# Altium PCB BOARD_2LAYER.PcbDoc (part 1 of 7)
Units mil, origin at the board's own origin, x right, y up, seen from the top; angles counter-clockwise.
Board outline 7677.17 x 7677.17 mil, 2 copper layers (Top Layer, Bottom Layer), stack 34.252 mil thick; 625 components, 375 nets, 1924 pads, 450 vias.
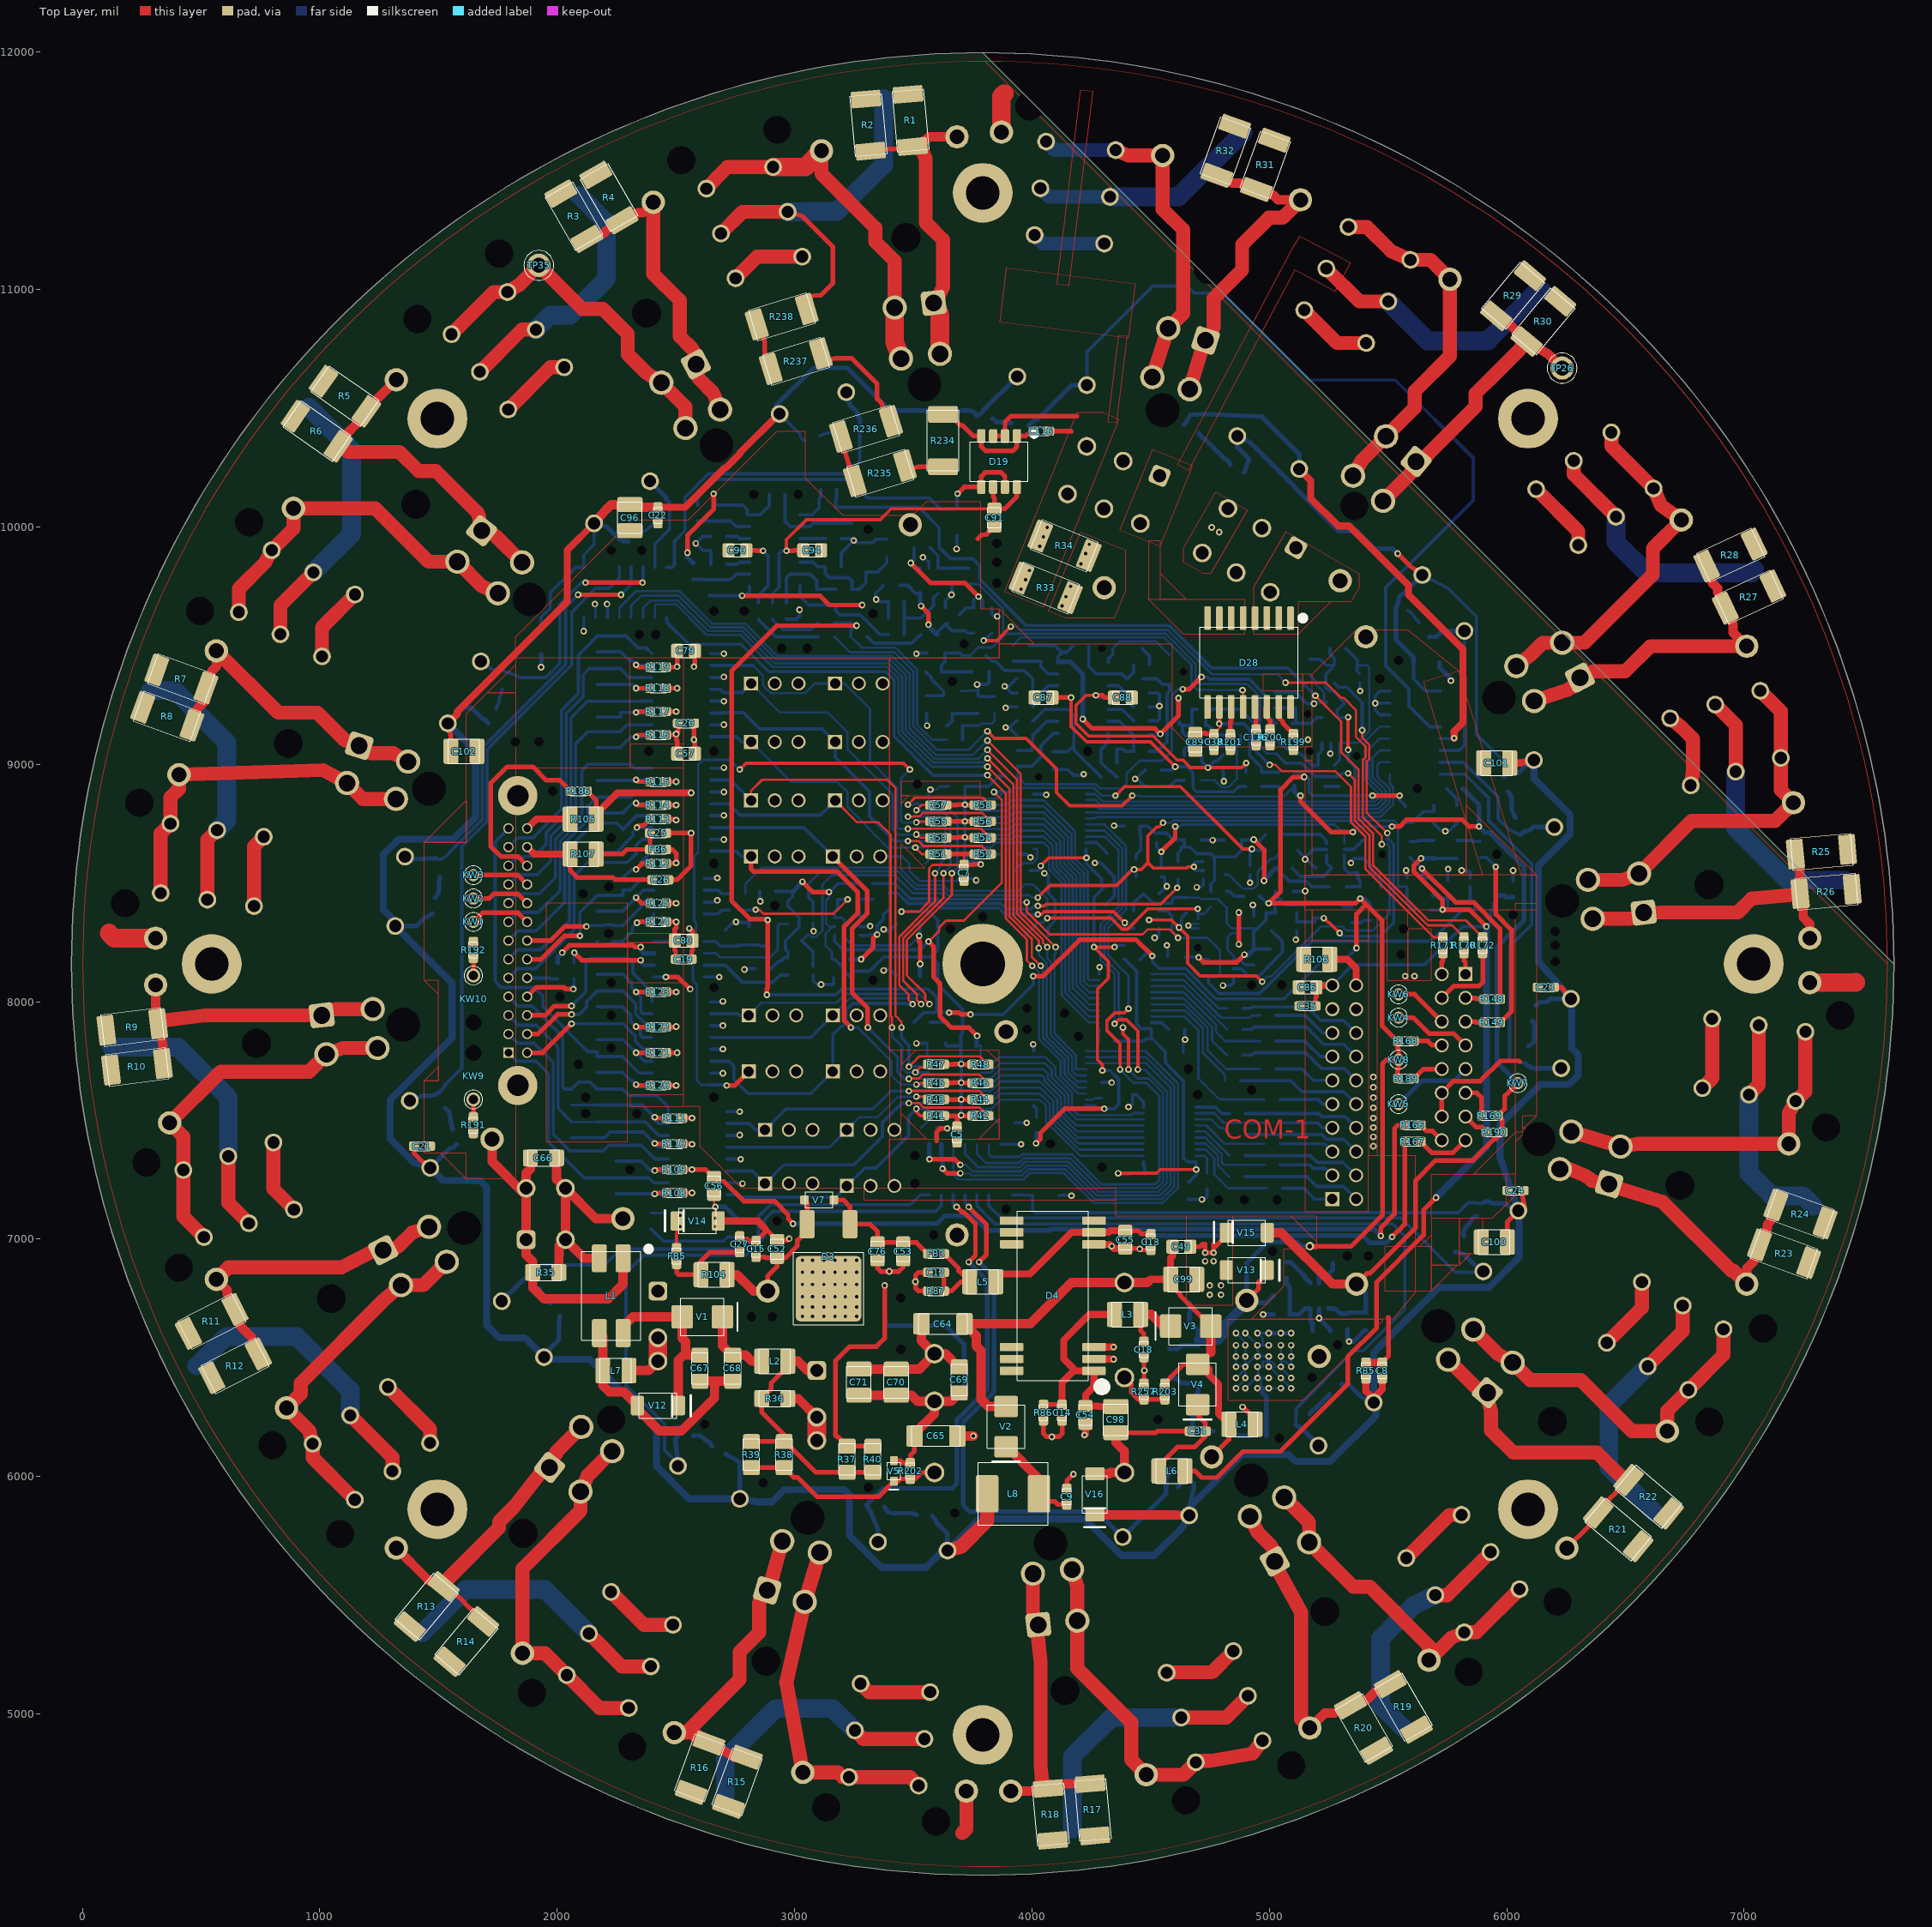
[diagram p0: Top Layer view]
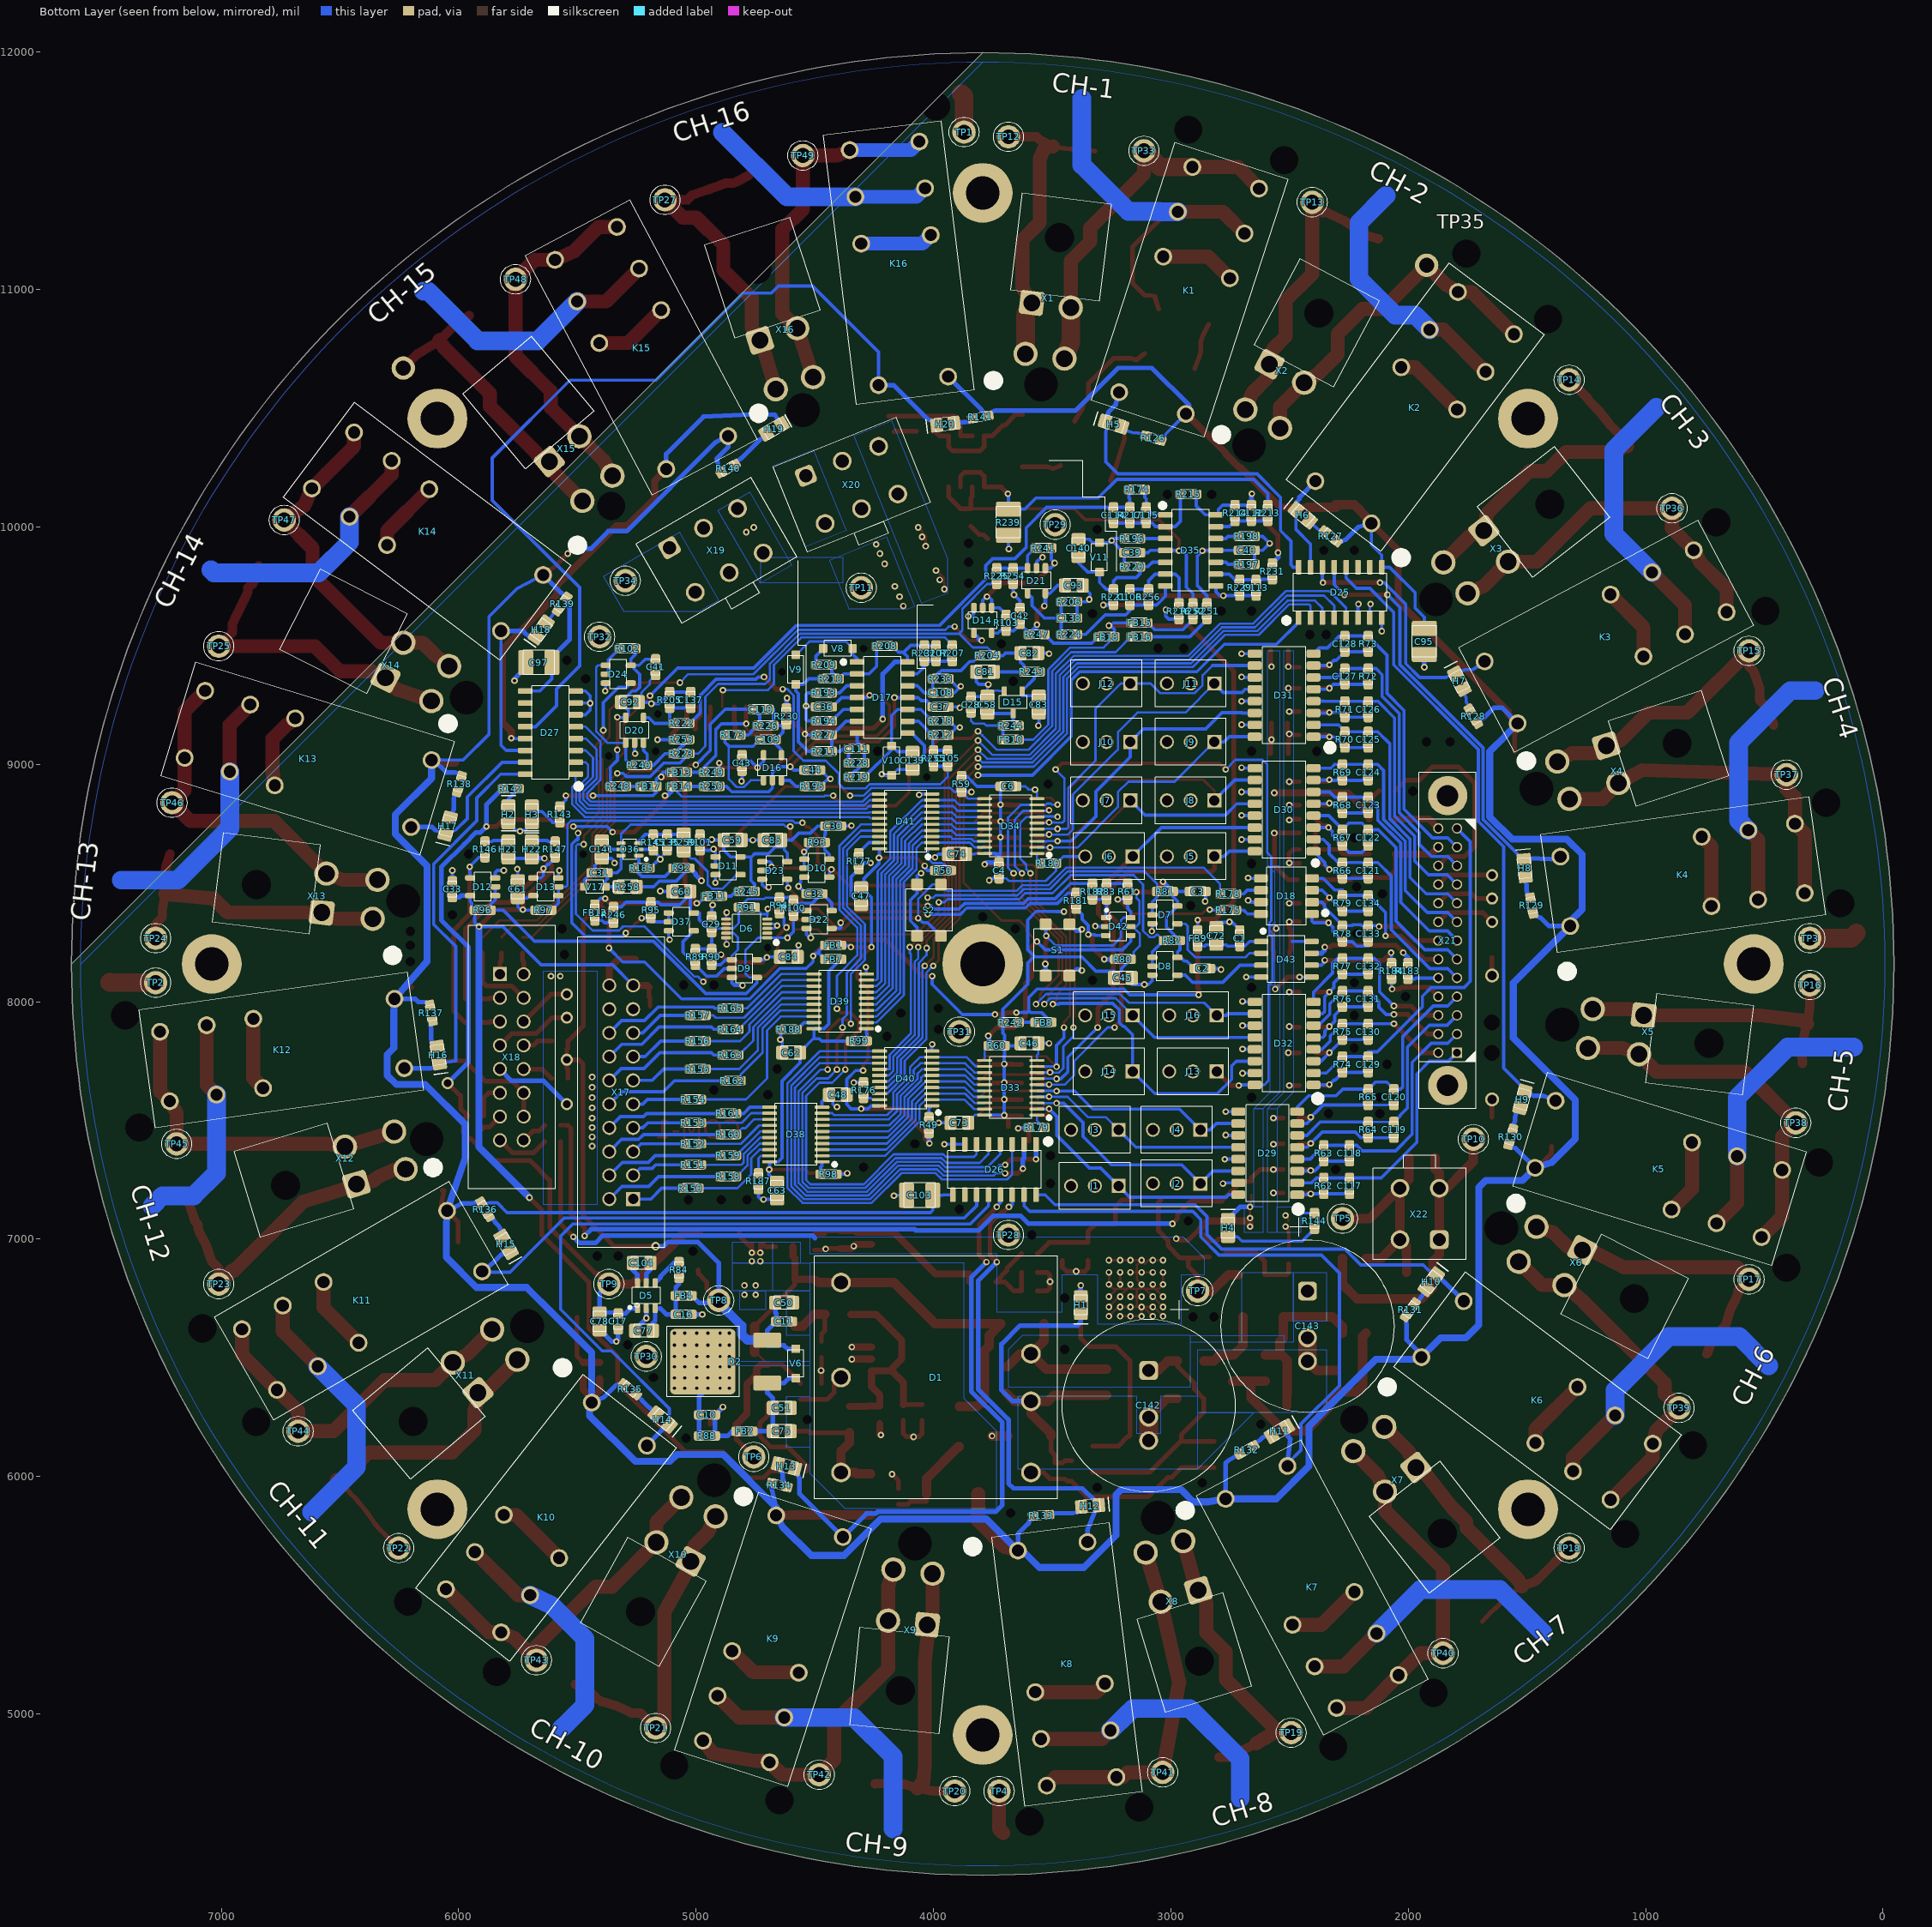
[diagram p1: Bottom Layer view, seen from below]

## Layer stack, top to bottom
Top Solder: solder mask 3, Solder_Mask, Dk 1
Top Layer: signal copper 1.5748
Dielectric 3: prepreg 31.1024, Core/Pre-preg, Dk 4.7
Bottom Layer: signal copper 1.5748
Bottom Solder: solder mask 3, Solder_Mask, Dk 1

## Board outline
7631.05,8159.45 ccw(c3792.46,8159.45) 3792.46,11998.03 ccw(c3792.46,8159.45) -46.12,8159.45 ccw(c3792.46,8159.45) 3792.46,4320.87 ccw(c3792.46,8159.45) 7631.05,8159.45 ccw(c3792.46,8159.45)

## Design rules (kind name [scope] priority, off if disabled: settings)
Clearance [All] p1: gap=10 ignorepadtopadclearanceinfootprint=FALSE
PolygonConnect PolygonConnect_In_OUT_L01_P006 [IsNamedPolygon('OUT_L01_P006')] p1: thpad.connectstyle=Relief thpad.reliefconductorwidth=19.68 thpad.reliefentries=4 thpad.polygonreliefangle="90 Angle" thpad.airgapwidth=19.68 smdpad.connectstyle=Relief smdpad.reliefconductorwidth=9.84 smdpad.reliefentries=4 smdpad.polygonreliefangle="90 Angle" smdpad.airgapwidth=9.84 via.connectstyle=Direct via.reliefconductorwidth=5.12 via.reliefentries=2 via.polygonreliefangle="90 Angle" via.airgapwidth=0
PolygonConnect PolygonConnect_In_GND_L01_P049 [IsNamedPolygon('GND_L01_P049')] p2: thpad.connectstyle=Relief thpad.reliefconductorwidth=19.68 thpad.reliefentries=4 thpad.polygonreliefangle="90 Angle" thpad.airgapwidth=19.68 smdpad.connectstyle=Relief smdpad.reliefconductorwidth=9.84 smdpad.reliefentries=4 smdpad.polygonreliefangle="90 Angle" smdpad.airgapwidth=9.84 via.connectstyle=Direct via.reliefconductorwidth=5.12 via.reliefentries=2 via.polygonreliefangle="90 Angle" via.airgapwidth=0
PolygonConnect PolygonConnect_In_GND_L01_P058 [IsNamedPolygon('GND_L01_P058')] p3: thpad.connectstyle=Relief thpad.reliefconductorwidth=19.68 thpad.reliefentries=4 thpad.polygonreliefangle="90 Angle" thpad.airgapwidth=19.68 smdpad.connectstyle=Relief smdpad.reliefconductorwidth=9.84 smdpad.reliefentries=4 smdpad.polygonreliefangle="90 Angle" smdpad.airgapwidth=9.84 via.connectstyle=Direct via.reliefconductorwidth=5.12 via.reliefentries=2 via.polygonreliefangle="90 Angle" via.airgapwidth=0
PolygonConnect PolygonConnect_In_GND_L01_P024 [IsNamedPolygon('GND_L01_P024')] p4: thpad.connectstyle=Relief thpad.reliefconductorwidth=19.68 thpad.reliefentries=4 thpad.polygonreliefangle="90 Angle" thpad.airgapwidth=19.68 smdpad.connectstyle=Relief smdpad.reliefconductorwidth=9.84 smdpad.reliefentries=4 smdpad.polygonreliefangle="90 Angle" smdpad.airgapwidth=9.84 via.connectstyle=Direct via.reliefconductorwidth=5.12 via.reliefentries=2 via.polygonreliefangle="90 Angle" via.airgapwidth=0
PolygonConnect PolygonConnect_In_GND_L01_P043 [IsNamedPolygon('GND_L01_P043')] p5: thpad.connectstyle=Relief thpad.reliefconductorwidth=19.68 thpad.reliefentries=4 thpad.polygonreliefangle="90 Angle" thpad.airgapwidth=19.68 smdpad.connectstyle=Relief smdpad.reliefconductorwidth=9.84 smdpad.reliefentries=4 smdpad.polygonreliefangle="90 Angle" smdpad.airgapwidth=9.84 via.connectstyle=Direct via.reliefconductorwidth=5.12 via.reliefentries=2 via.polygonreliefangle="90 Angle" via.airgapwidth=0
PolygonConnect PolygonConnect_In_GND_L02_P051 [IsNamedPolygon('GND_L02_P051')] p6: thpad.connectstyle=Relief thpad.reliefconductorwidth=19.68 thpad.reliefentries=4 thpad.polygonreliefangle="90 Angle" thpad.airgapwidth=19.68 smdpad.connectstyle=Relief smdpad.reliefconductorwidth=9.84 smdpad.reliefentries=4 smdpad.polygonreliefangle="90 Angle" smdpad.airgapwidth=9.84 via.connectstyle=Direct via.reliefconductorwidth=5.12 via.reliefentries=2 via.polygonreliefangle="90 Angle" via.airgapwidth=0
PolygonConnect PolygonConnect_In_IN_COM_L01_P015 [IsNamedPolygon('IN_COM_L01_P015')] p7: thpad.connectstyle=Relief thpad.reliefconductorwidth=19.68 thpad.reliefentries=4 thpad.polygonreliefangle="90 Angle" thpad.airgapwidth=19.68 smdpad.connectstyle=Relief smdpad.reliefconductorwidth=9.84 smdpad.reliefentries=4 smdpad.polygonreliefangle="90 Angle" smdpad.airgapwidth=9.84 via.connectstyle=Direct via.reliefconductorwidth=5.12 via.reliefentries=2 via.polygonreliefangle="90 Angle" via.airgapwidth=0
PolygonConnect PolygonConnect_In_~OUT_L01_P005 [IsNamedPolygon('~OUT_L01_P005')] p8: thpad.connectstyle=Relief thpad.reliefconductorwidth=19.68 thpad.reliefentries=4 thpad.polygonreliefangle="90 Angle" thpad.airgapwidth=19.68 smdpad.connectstyle=Relief smdpad.reliefconductorwidth=9.84 smdpad.reliefentries=4 smdpad.polygonreliefangle="90 Angle" smdpad.airgapwidth=9.84 via.connectstyle=Direct via.reliefconductorwidth=5.12 via.reliefentries=2 via.polygonreliefangle="90 Angle" via.airgapwidth=0
PolygonConnect PolygonConnect_In_~OUT_L01_P004 [IsNamedPolygon('~OUT_L01_P004')] p9: thpad.connectstyle=Relief thpad.reliefconductorwidth=19.68 thpad.reliefentries=4 thpad.polygonreliefangle="90 Angle" thpad.airgapwidth=19.68 smdpad.connectstyle=Relief smdpad.reliefconductorwidth=9.84 smdpad.reliefentries=4 smdpad.polygonreliefangle="90 Angle" smdpad.airgapwidth=9.84 via.connectstyle=Direct via.reliefconductorwidth=5.12 via.reliefentries=2 via.polygonreliefangle="90 Angle" via.airgapwidth=0
PolygonConnect PolygonConnect_In_~IN_COM_L02_P018 [IsNamedPolygon('~IN_COM_L02_P018')] p10: thpad.connectstyle=Relief thpad.reliefconductorwidth=19.68 thpad.reliefentries=4 thpad.polygonreliefangle="90 Angle" thpad.airgapwidth=19.68 smdpad.connectstyle=Relief smdpad.reliefconductorwidth=9.84 smdpad.reliefentries=4 smdpad.polygonreliefangle="90 Angle" smdpad.airgapwidth=9.84 via.connectstyle=Direct via.reliefconductorwidth=5.12 via.reliefentries=2 via.polygonreliefangle="90 Angle" via.airgapwidth=0
PolygonConnect PolygonConnect_In_GND_L01_P082 [IsNamedPolygon('GND_L01_P082')] p11: thpad.connectstyle=Relief thpad.reliefconductorwidth=19.68 thpad.reliefentries=4 thpad.polygonreliefangle="90 Angle" thpad.airgapwidth=19.68 smdpad.connectstyle=Relief smdpad.reliefconductorwidth=9.84 smdpad.reliefentries=4 smdpad.polygonreliefangle="90 Angle" smdpad.airgapwidth=9.84 via.connectstyle=Direct via.reliefconductorwidth=5.12 via.reliefentries=2 via.polygonreliefangle="90 Angle" via.airgapwidth=0
PolygonConnect PolygonConnect_In_GND_L01_P076 [IsNamedPolygon('GND_L01_P076')] p12: thpad.connectstyle=Relief thpad.reliefconductorwidth=19.68 thpad.reliefentries=4 thpad.polygonreliefangle="90 Angle" thpad.airgapwidth=19.68 smdpad.connectstyle=Relief smdpad.reliefconductorwidth=9.84 smdpad.reliefentries=4 smdpad.polygonreliefangle="90 Angle" smdpad.airgapwidth=9.84 via.connectstyle=Direct via.reliefconductorwidth=5.12 via.reliefentries=2 via.polygonreliefangle="90 Angle" via.airgapwidth=0
PolygonConnect PolygonConnect_In_GND_L01_P045 [IsNamedPolygon('GND_L01_P045')] p13: thpad.connectstyle=Relief thpad.reliefconductorwidth=19.68 thpad.reliefentries=4 thpad.polygonreliefangle="90 Angle" thpad.airgapwidth=19.68 smdpad.connectstyle=Relief smdpad.reliefconductorwidth=9.84 smdpad.reliefentries=4 smdpad.polygonreliefangle="90 Angle" smdpad.airgapwidth=9.84 via.connectstyle=Direct via.reliefconductorwidth=5.12 via.reliefentries=2 via.polygonreliefangle="90 Angle" via.airgapwidth=0
PolygonConnect PolygonConnect_In_-U_COM_L02_P103 [IsNamedPolygon('-U_COM_L02_P103')] p14: thpad.connectstyle=Relief thpad.reliefconductorwidth=19.68 thpad.reliefentries=4 thpad.polygonreliefangle="90 Angle" thpad.airgapwidth=19.68 smdpad.connectstyle=Relief smdpad.reliefconductorwidth=9.84 smdpad.reliefentries=4 smdpad.polygonreliefangle="90 Angle" smdpad.airgapwidth=9.84 via.connectstyle=Direct via.reliefconductorwidth=5.12 via.reliefentries=2 via.polygonreliefangle="90 Angle" via.airgapwidth=0
PolygonConnect PolygonConnect_In_$3N7062_L02_P089 [IsNamedPolygon('$3N7062_L02_P089')] p15: thpad.connectstyle=Relief thpad.reliefconductorwidth=19.68 thpad.reliefentries=4 thpad.polygonreliefangle="90 Angle" thpad.airgapwidth=19.68 smdpad.connectstyle=Relief smdpad.reliefconductorwidth=9.84 smdpad.reliefentries=4 smdpad.polygonreliefangle="90 Angle" smdpad.airgapwidth=9.84 via.connectstyle=Direct via.reliefconductorwidth=5.12 via.reliefentries=2 via.polygonreliefangle="90 Angle" via.airgapwidth=0
PolygonConnect PolygonConnect_In_GND_L01_P030 [IsNamedPolygon('GND_L01_P030')] p16: thpad.connectstyle=Relief thpad.reliefconductorwidth=19.68 thpad.reliefentries=4 thpad.polygonreliefangle="90 Angle" thpad.airgapwidth=19.68 smdpad.connectstyle=Relief smdpad.reliefconductorwidth=9.84 smdpad.reliefentries=4 smdpad.polygonreliefangle="90 Angle" smdpad.airgapwidth=9.84 via.connectstyle=Direct via.reliefconductorwidth=5.12 via.reliefentries=2 via.polygonreliefangle="90 Angle" via.airgapwidth=0
PolygonConnect PolygonConnect_In_$3N7062_L02_P088 [IsNamedPolygon('$3N7062_L02_P088')] p17: thpad.connectstyle=Relief thpad.reliefconductorwidth=19.68 thpad.reliefentries=4 thpad.polygonreliefangle="90 Angle" thpad.airgapwidth=19.68 smdpad.connectstyle=Relief smdpad.reliefconductorwidth=9.84 smdpad.reliefentries=4 smdpad.polygonreliefangle="90 Angle" smdpad.airgapwidth=9.84 via.connectstyle=Direct via.reliefconductorwidth=5.12 via.reliefentries=2 via.polygonreliefangle="90 Angle" via.airgapwidth=0
PolygonConnect PolygonConnect_In_~IN_COM_L02_P020 [IsNamedPolygon('~IN_COM_L02_P020')] p18: thpad.connectstyle=Relief thpad.reliefconductorwidth=19.68 thpad.reliefentries=4 thpad.polygonreliefangle="90 Angle" thpad.airgapwidth=19.68 smdpad.connectstyle=Relief smdpad.reliefconductorwidth=9.84 smdpad.reliefentries=4 smdpad.polygonreliefangle="90 Angle" smdpad.airgapwidth=9.84 via.connectstyle=Direct via.reliefconductorwidth=5.12 via.reliefentries=2 via.polygonreliefangle="90 Angle" via.airgapwidth=0
PolygonConnect PolygonConnect_In_GND_L01_P067 [IsNamedPolygon('GND_L01_P067')] p19: thpad.connectstyle=Relief thpad.reliefconductorwidth=19.68 thpad.reliefentries=4 thpad.polygonreliefangle="90 Angle" thpad.airgapwidth=19.68 smdpad.connectstyle=Relief smdpad.reliefconductorwidth=9.84 smdpad.reliefentries=4 smdpad.polygonreliefangle="90 Angle" smdpad.airgapwidth=9.84 via.connectstyle=Direct via.reliefconductorwidth=5.12 via.reliefentries=2 via.polygonreliefangle="90 Angle" via.airgapwidth=0
PolygonConnect PolygonConnect_In_GND_L01_P035 [IsNamedPolygon('GND_L01_P035')] p20: thpad.connectstyle=Relief thpad.reliefconductorwidth=19.68 thpad.reliefentries=4 thpad.polygonreliefangle="90 Angle" thpad.airgapwidth=19.68 smdpad.connectstyle=Relief smdpad.reliefconductorwidth=9.84 smdpad.reliefentries=4 smdpad.polygonreliefangle="90 Angle" smdpad.airgapwidth=9.84 via.connectstyle=Direct via.reliefconductorwidth=5.12 via.reliefentries=2 via.polygonreliefangle="90 Angle" via.airgapwidth=0
PolygonConnect PolygonConnect_In_GND_L01_P055 [IsNamedPolygon('GND_L01_P055')] p21: thpad.connectstyle=Relief thpad.reliefconductorwidth=19.68 thpad.reliefentries=4 thpad.polygonreliefangle="90 Angle" thpad.airgapwidth=19.68 smdpad.connectstyle=Relief smdpad.reliefconductorwidth=9.84 smdpad.reliefentries=4 smdpad.polygonreliefangle="90 Angle" smdpad.airgapwidth=9.84 via.connectstyle=Direct via.reliefconductorwidth=5.12 via.reliefentries=2 via.polygonreliefangle="90 Angle" via.airgapwidth=0
PolygonConnect PolygonConnect_In_GND_L01_P070 [IsNamedPolygon('GND_L01_P070')] p22: thpad.connectstyle=Relief thpad.reliefconductorwidth=19.68 thpad.reliefentries=4 thpad.polygonreliefangle="90 Angle" thpad.airgapwidth=19.68 smdpad.connectstyle=Relief smdpad.reliefconductorwidth=9.84 smdpad.reliefentries=4 smdpad.polygonreliefangle="90 Angle" smdpad.airgapwidth=9.84 via.connectstyle=Direct via.reliefconductorwidth=5.12 via.reliefentries=2 via.polygonreliefangle="90 Angle" via.airgapwidth=0
PolygonConnect PolygonConnect_In_~IN_COM_L01_P017 [IsNamedPolygon('~IN_COM_L01_P017')] p23: thpad.connectstyle=Relief thpad.reliefconductorwidth=19.68 thpad.reliefentries=4 thpad.polygonreliefangle="90 Angle" thpad.airgapwidth=19.68 smdpad.connectstyle=Relief smdpad.reliefconductorwidth=9.84 smdpad.reliefentries=4 smdpad.polygonreliefangle="90 Angle" smdpad.airgapwidth=9.84 via.connectstyle=Direct via.reliefconductorwidth=5.12 via.reliefentries=2 via.polygonreliefangle="90 Angle" via.airgapwidth=0
PolygonConnect PolygonConnect_In_GND_L01_P060 [IsNamedPolygon('GND_L01_P060')] p24: thpad.connectstyle=Relief thpad.reliefconductorwidth=19.68 thpad.reliefentries=4 thpad.polygonreliefangle="90 Angle" thpad.airgapwidth=19.68 smdpad.connectstyle=Relief smdpad.reliefconductorwidth=9.84 smdpad.reliefentries=4 smdpad.polygonreliefangle="90 Angle" smdpad.airgapwidth=9.84 via.connectstyle=Direct via.reliefconductorwidth=5.12 via.reliefentries=2 via.polygonreliefangle="90 Angle" via.airgapwidth=0
PolygonConnect PolygonConnect_In_GND_L01_P023 [IsNamedPolygon('GND_L01_P023')] p25: thpad.connectstyle=Relief thpad.reliefconductorwidth=19.68 thpad.reliefentries=4 thpad.polygonreliefangle="90 Angle" thpad.airgapwidth=19.68 smdpad.connectstyle=Relief smdpad.reliefconductorwidth=9.84 smdpad.reliefentries=4 smdpad.polygonreliefangle="90 Angle" smdpad.airgapwidth=9.84 via.connectstyle=Direct via.reliefconductorwidth=5.12 via.reliefentries=2 via.polygonreliefangle="90 Angle" via.airgapwidth=0
PolygonConnect PolygonConnect_In_~OUT_L02_P000 [IsNamedPolygon('~OUT_L02_P000')] p26: thpad.connectstyle=Relief thpad.reliefconductorwidth=19.68 thpad.reliefentries=4 thpad.polygonreliefangle="90 Angle" thpad.airgapwidth=19.68 smdpad.connectstyle=Relief smdpad.reliefconductorwidth=9.84 smdpad.reliefentries=4 smdpad.polygonreliefangle="90 Angle" smdpad.airgapwidth=9.84 via.connectstyle=Direct via.reliefconductorwidth=5.12 via.reliefentries=2 via.polygonreliefangle="90 Angle" via.airgapwidth=0
PolygonConnect PolygonConnect_In_GND_L02_P033 [IsNamedPolygon('GND_L02_P033')] p27: thpad.connectstyle=Relief thpad.reliefconductorwidth=19.68 thpad.reliefentries=4 thpad.polygonreliefangle="90 Angle" thpad.airgapwidth=19.68 smdpad.connectstyle=Relief smdpad.reliefconductorwidth=9.84 smdpad.reliefentries=4 smdpad.polygonreliefangle="90 Angle" smdpad.airgapwidth=9.84 via.connectstyle=Direct via.reliefconductorwidth=5.12 via.reliefentries=2 via.polygonreliefangle="90 Angle" via.airgapwidth=0
PolygonConnect PolygonConnect_In_GND_L02_P050 [IsNamedPolygon('GND_L02_P050')] p28: thpad.connectstyle=Relief thpad.reliefconductorwidth=19.68 thpad.reliefentries=4 thpad.polygonreliefangle="90 Angle" thpad.airgapwidth=19.68 smdpad.connectstyle=Relief smdpad.reliefconductorwidth=9.84 smdpad.reliefentries=4 smdpad.polygonreliefangle="90 Angle" smdpad.airgapwidth=9.84 via.connectstyle=Direct via.reliefconductorwidth=5.12 via.reliefentries=2 via.polygonreliefangle="90 Angle" via.airgapwidth=0
PolygonConnect PolygonConnect_In_GND_L02_P032 [IsNamedPolygon('GND_L02_P032')] p29: thpad.connectstyle=Relief thpad.reliefconductorwidth=19.68 thpad.reliefentries=4 thpad.polygonreliefangle="90 Angle" thpad.airgapwidth=19.68 smdpad.connectstyle=Relief smdpad.reliefconductorwidth=9.84 smdpad.reliefentries=4 smdpad.polygonreliefangle="90 Angle" smdpad.airgapwidth=9.84 via.connectstyle=Direct via.reliefconductorwidth=5.12 via.reliefentries=2 via.polygonreliefangle="90 Angle" via.airgapwidth=0
PolygonConnect PolygonConnect_In_OUT_L01_P010 [IsNamedPolygon('OUT_L01_P010')] p30: thpad.connectstyle=Relief thpad.reliefconductorwidth=19.68 thpad.reliefentries=4 thpad.polygonreliefangle="90 Angle" thpad.airgapwidth=19.68 smdpad.connectstyle=Relief smdpad.reliefconductorwidth=9.84 smdpad.reliefentries=4 smdpad.polygonreliefangle="90 Angle" smdpad.airgapwidth=9.84 via.connectstyle=Direct via.reliefconductorwidth=5.12 via.reliefentries=2 via.polygonreliefangle="90 Angle" via.airgapwidth=0
PolygonConnect PolygonConnect_In_GND_L01_P080 [IsNamedPolygon('GND_L01_P080')] p31: thpad.connectstyle=Relief thpad.reliefconductorwidth=19.68 thpad.reliefentries=4 thpad.polygonreliefangle="90 Angle" thpad.airgapwidth=19.68 smdpad.connectstyle=Relief smdpad.reliefconductorwidth=9.84 smdpad.reliefentries=4 smdpad.polygonreliefangle="90 Angle" smdpad.airgapwidth=9.84 via.connectstyle=Direct via.reliefconductorwidth=5.12 via.reliefentries=2 via.polygonreliefangle="90 Angle" via.airgapwidth=0
PolygonConnect PolygonConnect_In_GND_L01_P064 [IsNamedPolygon('GND_L01_P064')] p32: thpad.connectstyle=Relief thpad.reliefconductorwidth=19.68 thpad.reliefentries=4 thpad.polygonreliefangle="90 Angle" thpad.airgapwidth=19.68 smdpad.connectstyle=Relief smdpad.reliefconductorwidth=9.84 smdpad.reliefentries=4 smdpad.polygonreliefangle="90 Angle" smdpad.airgapwidth=9.84 via.connectstyle=Direct via.reliefconductorwidth=5.12 via.reliefentries=2 via.polygonreliefangle="90 Angle" via.airgapwidth=0
PolygonConnect PolygonConnect_In_GND_L01_P079 [IsNamedPolygon('GND_L01_P079')] p33: thpad.connectstyle=Relief thpad.reliefconductorwidth=19.68 thpad.reliefentries=4 thpad.polygonreliefangle="90 Angle" thpad.airgapwidth=19.68 smdpad.connectstyle=Relief smdpad.reliefconductorwidth=9.84 smdpad.reliefentries=4 smdpad.polygonreliefangle="90 Angle" smdpad.airgapwidth=9.84 via.connectstyle=Direct via.reliefconductorwidth=5.12 via.reliefentries=2 via.polygonreliefangle="90 Angle" via.airgapwidth=0
PolygonConnect PolygonConnect_In_$3N7062_L02_P087 [IsNamedPolygon('$3N7062_L02_P087')] p34: thpad.connectstyle=Relief thpad.reliefconductorwidth=19.68 thpad.reliefentries=4 thpad.polygonreliefangle="90 Angle" thpad.airgapwidth=19.68 smdpad.connectstyle=Relief smdpad.reliefconductorwidth=9.84 smdpad.reliefentries=4 smdpad.polygonreliefangle="90 Angle" smdpad.airgapwidth=9.84 via.connectstyle=Direct via.reliefconductorwidth=5.12 via.reliefentries=2 via.polygonreliefangle="90 Angle" via.airgapwidth=0
PolygonConnect PolygonConnect_In_GND_L01_P066 [IsNamedPolygon('GND_L01_P066')] p35: thpad.connectstyle=Relief thpad.reliefconductorwidth=19.68 thpad.reliefentries=4 thpad.polygonreliefangle="90 Angle" thpad.airgapwidth=19.68 smdpad.connectstyle=Relief smdpad.reliefconductorwidth=9.84 smdpad.reliefentries=4 smdpad.polygonreliefangle="90 Angle" smdpad.airgapwidth=9.84 via.connectstyle=Direct via.reliefconductorwidth=5.12 via.reliefentries=2 via.polygonreliefangle="90 Angle" via.airgapwidth=0
PolygonConnect PolygonConnect_In_-U_COM_L02_P097 [IsNamedPolygon('-U_COM_L02_P097')] p36: thpad.connectstyle=Relief thpad.reliefconductorwidth=19.68 thpad.reliefentries=4 thpad.polygonreliefangle="90 Angle" thpad.airgapwidth=19.68 smdpad.connectstyle=Relief smdpad.reliefconductorwidth=9.84 smdpad.reliefentries=4 smdpad.polygonreliefangle="90 Angle" smdpad.airgapwidth=9.84 via.connectstyle=Direct via.reliefconductorwidth=5.12 via.reliefentries=2 via.polygonreliefangle="90 Angle" via.airgapwidth=0
PolygonConnect PolygonConnect_In_IN_COM_L01_P014 [IsNamedPolygon('IN_COM_L01_P014')] p37: thpad.connectstyle=Relief thpad.reliefconductorwidth=19.68 thpad.reliefentries=4 thpad.polygonreliefangle="90 Angle" thpad.airgapwidth=19.68 smdpad.connectstyle=Relief smdpad.reliefconductorwidth=9.84 smdpad.reliefentries=4 smdpad.polygonreliefangle="90 Angle" smdpad.airgapwidth=9.84 via.connectstyle=Direct via.reliefconductorwidth=5.12 via.reliefentries=2 via.polygonreliefangle="90 Angle" via.airgapwidth=0
PolygonConnect PolygonConnect_In_OUT_L02_P009 [IsNamedPolygon('OUT_L02_P009')] p38: thpad.connectstyle=Relief thpad.reliefconductorwidth=19.68 thpad.reliefentries=4 thpad.polygonreliefangle="90 Angle" thpad.airgapwidth=19.68 smdpad.connectstyle=Relief smdpad.reliefconductorwidth=9.84 smdpad.reliefentries=4 smdpad.polygonreliefangle="90 Angle" smdpad.airgapwidth=9.84 via.connectstyle=Direct via.reliefconductorwidth=5.12 via.reliefentries=2 via.polygonreliefangle="90 Angle" via.airgapwidth=0
PolygonConnect PolygonConnect_In_-U_COM_L02_P095 [IsNamedPolygon('-U_COM_L02_P095')] p39: thpad.connectstyle=Relief thpad.reliefconductorwidth=19.68 thpad.reliefentries=4 thpad.polygonreliefangle="90 Angle" thpad.airgapwidth=19.68 smdpad.connectstyle=Relief smdpad.reliefconductorwidth=9.84 smdpad.reliefentries=4 smdpad.polygonreliefangle="90 Angle" smdpad.airgapwidth=9.84 via.connectstyle=Direct via.reliefconductorwidth=5.12 via.reliefentries=2 via.polygonreliefangle="90 Angle" via.airgapwidth=0
PolygonConnect PolygonConnect_In_GND_L01_P053 [IsNamedPolygon('GND_L01_P053')] p40: thpad.connectstyle=Relief thpad.reliefconductorwidth=19.68 thpad.reliefentries=4 thpad.polygonreliefangle="90 Angle" thpad.airgapwidth=19.68 smdpad.connectstyle=Relief smdpad.reliefconductorwidth=9.84 smdpad.reliefentries=4 smdpad.polygonreliefangle="90 Angle" smdpad.airgapwidth=9.84 via.connectstyle=Direct via.reliefconductorwidth=5.12 via.reliefentries=2 via.polygonreliefangle="90 Angle" via.airgapwidth=0
PolygonConnect PolygonConnect_In_GND_L01_P075 [IsNamedPolygon('GND_L01_P075')] p41: thpad.connectstyle=Relief thpad.reliefconductorwidth=19.68 thpad.reliefentries=4 thpad.polygonreliefangle="90 Angle" thpad.airgapwidth=19.68 smdpad.connectstyle=Relief smdpad.reliefconductorwidth=9.84 smdpad.reliefentries=4 smdpad.polygonreliefangle="90 Angle" smdpad.airgapwidth=9.84 via.connectstyle=Direct via.reliefconductorwidth=5.12 via.reliefentries=2 via.polygonreliefangle="90 Angle" via.airgapwidth=0
PolygonConnect PolygonConnect_In_GND_L02_P048 [IsNamedPolygon('GND_L02_P048')] p42: thpad.connectstyle=Relief thpad.reliefconductorwidth=19.68 thpad.reliefentries=4 thpad.polygonreliefangle="90 Angle" thpad.airgapwidth=19.68 smdpad.connectstyle=Relief smdpad.reliefconductorwidth=9.84 smdpad.reliefentries=4 smdpad.polygonreliefangle="90 Angle" smdpad.airgapwidth=9.84 via.connectstyle=Direct via.reliefconductorwidth=5.12 via.reliefentries=2 via.polygonreliefangle="90 Angle" via.airgapwidth=0
PolygonConnect PolygonConnect_In_GND_L01_P056 [IsNamedPolygon('GND_L01_P056')] p43: thpad.connectstyle=Relief thpad.reliefconductorwidth=19.68 thpad.reliefentries=4 thpad.polygonreliefangle="90 Angle" thpad.airgapwidth=19.68 smdpad.connectstyle=Relief smdpad.reliefconductorwidth=9.84 smdpad.reliefentries=4 smdpad.polygonreliefangle="90 Angle" smdpad.airgapwidth=9.84 via.connectstyle=Direct via.reliefconductorwidth=5.12 via.reliefentries=2 via.polygonreliefangle="90 Angle" via.airgapwidth=0
PolygonConnect PolygonConnect_In_+U_COM_L02_P107 [IsNamedPolygon('+U_COM_L02_P107')] p44: thpad.connectstyle=Relief thpad.reliefconductorwidth=19.68 thpad.reliefentries=4 thpad.polygonreliefangle="90 Angle" thpad.airgapwidth=19.68 smdpad.connectstyle=Relief smdpad.reliefconductorwidth=9.84 smdpad.reliefentries=4 smdpad.polygonreliefangle="90 Angle" smdpad.airgapwidth=9.84 via.connectstyle=Direct via.reliefconductorwidth=5.12 via.reliefentries=2 via.polygonreliefangle="90 Angle" via.airgapwidth=0
PolygonConnect PolygonConnect_In_GND_L01_P065 [IsNamedPolygon('GND_L01_P065')] p45: thpad.connectstyle=Relief thpad.reliefconductorwidth=19.68 thpad.reliefentries=4 thpad.polygonreliefangle="90 Angle" thpad.airgapwidth=19.68 smdpad.connectstyle=Relief smdpad.reliefconductorwidth=9.84 smdpad.reliefentries=4 smdpad.polygonreliefangle="90 Angle" smdpad.airgapwidth=9.84 via.connectstyle=Direct via.reliefconductorwidth=5.12 via.reliefentries=2 via.polygonreliefangle="90 Angle" via.airgapwidth=0
PolygonConnect PolygonConnect_In_GND_L01_P034 [IsNamedPolygon('GND_L01_P034')] p46: thpad.connectstyle=Relief thpad.reliefconductorwidth=19.68 thpad.reliefentries=4 thpad.polygonreliefangle="90 Angle" thpad.airgapwidth=19.68 smdpad.connectstyle=Relief smdpad.reliefconductorwidth=9.84 smdpad.reliefentries=4 smdpad.polygonreliefangle="90 Angle" smdpad.airgapwidth=9.84 via.connectstyle=Direct via.reliefconductorwidth=5.12 via.reliefentries=2 via.polygonreliefangle="90 Angle" via.airgapwidth=0
PolygonConnect PolygonConnect_In_GND_L01_P021 [IsNamedPolygon('GND_L01_P021')] p47: thpad.connectstyle=Relief thpad.reliefconductorwidth=19.68 thpad.reliefentries=4 thpad.polygonreliefangle="90 Angle" thpad.airgapwidth=19.68 smdpad.connectstyle=Relief smdpad.reliefconductorwidth=9.84 smdpad.reliefentries=4 smdpad.polygonreliefangle="90 Angle" smdpad.airgapwidth=9.84 via.connectstyle=Direct via.reliefconductorwidth=5.12 via.reliefentries=2 via.polygonreliefangle="90 Angle" via.airgapwidth=0
PolygonConnect PolygonConnect_In_GND_L01_P037 [IsNamedPolygon('GND_L01_P037')] p48: thpad.connectstyle=Relief thpad.reliefconductorwidth=19.68 thpad.reliefentries=4 thpad.polygonreliefangle="90 Angle" thpad.airgapwidth=19.68 smdpad.connectstyle=Relief smdpad.reliefconductorwidth=9.84 smdpad.reliefentries=4 smdpad.polygonreliefangle="90 Angle" smdpad.airgapwidth=9.84 via.connectstyle=Direct via.reliefconductorwidth=5.12 via.reliefentries=2 via.polygonreliefangle="90 Angle" via.airgapwidth=0
PolygonConnect PolygonConnect_In_+U_COM_L02_P104 [IsNamedPolygon('+U_COM_L02_P104')] p49: thpad.connectstyle=Relief thpad.reliefconductorwidth=19.68 thpad.reliefentries=4 thpad.polygonreliefangle="90 Angle" thpad.airgapwidth=19.68 smdpad.connectstyle=Relief smdpad.reliefconductorwidth=9.84 smdpad.reliefentries=4 smdpad.polygonreliefangle="90 Angle" smdpad.airgapwidth=9.84 via.connectstyle=Direct via.reliefconductorwidth=5.12 via.reliefentries=2 via.polygonreliefangle="90 Angle" via.airgapwidth=0
PolygonConnect PolygonConnect_In_+U_COM_L02_P106 [IsNamedPolygon('+U_COM_L02_P106')] p50: thpad.connectstyle=Relief thpad.reliefconductorwidth=19.68 thpad.reliefentries=4 thpad.polygonreliefangle="90 Angle" thpad.airgapwidth=19.68 smdpad.connectstyle=Relief smdpad.reliefconductorwidth=9.84 smdpad.reliefentries=4 smdpad.polygonreliefangle="90 Angle" smdpad.airgapwidth=9.84 via.connectstyle=Direct via.reliefconductorwidth=5.12 via.reliefentries=2 via.polygonreliefangle="90 Angle" via.airgapwidth=0
PolygonConnect PolygonConnect_In_GND_L01_P063 [IsNamedPolygon('GND_L01_P063')] p51: thpad.connectstyle=Relief thpad.reliefconductorwidth=19.68 thpad.reliefentries=4 thpad.polygonreliefangle="90 Angle" thpad.airgapwidth=19.68 smdpad.connectstyle=Relief smdpad.reliefconductorwidth=9.84 smdpad.reliefentries=4 smdpad.polygonreliefangle="90 Angle" smdpad.airgapwidth=9.84 via.connectstyle=Direct via.reliefconductorwidth=5.12 via.reliefentries=2 via.polygonreliefangle="90 Angle" via.airgapwidth=0
PolygonConnect PolygonConnect_In_-U_COM_L02_P092 [IsNamedPolygon('-U_COM_L02_P092')] p52: thpad.connectstyle=Relief thpad.reliefconductorwidth=19.68 thpad.reliefentries=4 thpad.polygonreliefangle="90 Angle" thpad.airgapwidth=19.68 smdpad.connectstyle=Relief smdpad.reliefconductorwidth=9.84 smdpad.reliefentries=4 smdpad.polygonreliefangle="90 Angle" smdpad.airgapwidth=9.84 via.connectstyle=Direct via.reliefconductorwidth=5.12 via.reliefentries=2 via.polygonreliefangle="90 Angle" via.airgapwidth=0
PolygonConnect PolygonConnect_In_$3N7062_L02_P090 [IsNamedPolygon('$3N7062_L02_P090')] p53: thpad.connectstyle=Relief thpad.reliefconductorwidth=19.68 thpad.reliefentries=4 thpad.polygonreliefangle="90 Angle" thpad.airgapwidth=19.68 smdpad.connectstyle=Relief smdpad.reliefconductorwidth=9.84 smdpad.reliefentries=4 smdpad.polygonreliefangle="90 Angle" smdpad.airgapwidth=9.84 via.connectstyle=Direct via.reliefconductorwidth=5.12 via.reliefentries=2 via.polygonreliefangle="90 Angle" via.airgapwidth=0
PolygonConnect PolygonConnect_In_GND_L01_P083 [IsNamedPolygon('GND_L01_P083')] p54: thpad.connectstyle=Relief thpad.reliefconductorwidth=19.68 thpad.reliefentries=4 thpad.polygonreliefangle="90 Angle" thpad.airgapwidth=19.68 smdpad.connectstyle=Relief smdpad.reliefconductorwidth=9.84 smdpad.reliefentries=4 smdpad.polygonreliefangle="90 Angle" smdpad.airgapwidth=9.84 via.connectstyle=Direct via.reliefconductorwidth=5.12 via.reliefentries=2 via.polygonreliefangle="90 Angle" via.airgapwidth=0
PolygonConnect PolygonConnect_In_GND_L02_P022 [IsNamedPolygon('GND_L02_P022')] p55: thpad.connectstyle=Relief thpad.reliefconductorwidth=19.68 thpad.reliefentries=4 thpad.polygonreliefangle="90 Angle" thpad.airgapwidth=19.68 smdpad.connectstyle=Relief smdpad.reliefconductorwidth=9.84 smdpad.reliefentries=4 smdpad.polygonreliefangle="90 Angle" smdpad.airgapwidth=9.84 via.connectstyle=Direct via.reliefconductorwidth=5.12 via.reliefentries=2 via.polygonreliefangle="90 Angle" via.airgapwidth=0
PolygonConnect PolygonConnect_In_~OUT_L01_P001 [IsNamedPolygon('~OUT_L01_P001')] p56: thpad.connectstyle=Relief thpad.reliefconductorwidth=19.68 thpad.reliefentries=4 thpad.polygonreliefangle="90 Angle" thpad.airgapwidth=19.68 smdpad.connectstyle=Relief smdpad.reliefconductorwidth=9.84 smdpad.reliefentries=4 smdpad.polygonreliefangle="90 Angle" smdpad.airgapwidth=9.84 via.connectstyle=Direct via.reliefconductorwidth=5.12 via.reliefentries=2 via.polygonreliefangle="90 Angle" via.airgapwidth=0
PolygonConnect PolygonConnect_In_OUT_L01_P012 [IsNamedPolygon('OUT_L01_P012')] p57: thpad.connectstyle=Relief thpad.reliefconductorwidth=19.68 thpad.reliefentries=4 thpad.polygonreliefangle="90 Angle" thpad.airgapwidth=19.68 smdpad.connectstyle=Relief smdpad.reliefconductorwidth=9.84 smdpad.reliefentries=4 smdpad.polygonreliefangle="90 Angle" smdpad.airgapwidth=9.84 via.connectstyle=Direct via.reliefconductorwidth=5.12 via.reliefentries=2 via.polygonreliefangle="90 Angle" via.airgapwidth=0
PolygonConnect PolygonConnect_In_$3N7061_L02_P086 [IsNamedPolygon('$3N7061_L02_P086')] p58: thpad.connectstyle=Relief thpad.reliefconductorwidth=19.68 thpad.reliefentries=4 thpad.polygonreliefangle="90 Angle" thpad.airgapwidth=19.68 smdpad.connectstyle=Relief smdpad.reliefconductorwidth=9.84 smdpad.reliefentries=4 smdpad.polygonreliefangle="90 Angle" smdpad.airgapwidth=9.84 via.connectstyle=Direct via.reliefconductorwidth=5.12 via.reliefentries=2 via.polygonreliefangle="90 Angle" via.airgapwidth=0
PolygonConnect PolygonConnect_In_OUT_L01_P011 [IsNamedPolygon('OUT_L01_P011')] p59: thpad.connectstyle=Relief thpad.reliefconductorwidth=19.68 thpad.reliefentries=4 thpad.polygonreliefangle="90 Angle" thpad.airgapwidth=19.68 smdpad.connectstyle=Relief smdpad.reliefconductorwidth=9.84 smdpad.reliefentries=4 smdpad.polygonreliefangle="90 Angle" smdpad.airgapwidth=9.84 via.connectstyle=Direct via.reliefconductorwidth=5.12 via.reliefentries=2 via.polygonreliefangle="90 Angle" via.airgapwidth=0
PolygonConnect PolygonConnect_In_GND_L01_P081 [IsNamedPolygon('GND_L01_P081')] p60: thpad.connectstyle=Relief thpad.reliefconductorwidth=19.68 thpad.reliefentries=4 thpad.polygonreliefangle="90 Angle" thpad.airgapwidth=19.68 smdpad.connectstyle=Relief smdpad.reliefconductorwidth=9.84 smdpad.reliefentries=4 smdpad.polygonreliefangle="90 Angle" smdpad.airgapwidth=9.84 via.connectstyle=Direct via.reliefconductorwidth=5.12 via.reliefentries=2 via.polygonreliefangle="90 Angle" via.airgapwidth=0
PolygonConnect PolygonConnect_In_$3N7061_L02_P085 [IsNamedPolygon('$3N7061_L02_P085')] p61: thpad.connectstyle=Relief thpad.reliefconductorwidth=19.68 thpad.reliefentries=4 thpad.polygonreliefangle="90 Angle" thpad.airgapwidth=19.68 smdpad.connectstyle=Relief smdpad.reliefconductorwidth=9.84 smdpad.reliefentries=4 smdpad.polygonreliefangle="90 Angle" smdpad.airgapwidth=9.84 via.connectstyle=Direct via.reliefconductorwidth=5.12 via.reliefentries=2 via.polygonreliefangle="90 Angle" via.airgapwidth=0
PolygonConnect PolygonConnect_In_GND_L01_P038 [IsNamedPolygon('GND_L01_P038')] p62: thpad.connectstyle=Relief thpad.reliefconductorwidth=19.68 thpad.reliefentries=4 thpad.polygonreliefangle="90 Angle" thpad.airgapwidth=19.68 smdpad.connectstyle=Relief smdpad.reliefconductorwidth=9.84 smdpad.reliefentries=4 smdpad.polygonreliefangle="90 Angle" smdpad.airgapwidth=9.84 via.connectstyle=Direct via.reliefconductorwidth=5.12 via.reliefentries=2 via.polygonreliefangle="90 Angle" via.airgapwidth=0
PolygonConnect PolygonConnect_In_GND_L02_P047 [IsNamedPolygon('GND_L02_P047')] p63: thpad.connectstyle=Relief thpad.reliefconductorwidth=19.68 thpad.reliefentries=4 thpad.polygonreliefangle="90 Angle" thpad.airgapwidth=19.68 smdpad.connectstyle=Relief smdpad.reliefconductorwidth=9.84 smdpad.reliefentries=4 smdpad.polygonreliefangle="90 Angle" smdpad.airgapwidth=9.84 via.connectstyle=Direct via.reliefconductorwidth=5.12 via.reliefentries=2 via.polygonreliefangle="90 Angle" via.airgapwidth=0
PolygonConnect PolygonConnect_In_GND_L01_P074 [IsNamedPolygon('GND_L01_P074')] p64: thpad.connectstyle=Relief thpad.reliefconductorwidth=19.68 thpad.reliefentries=4 thpad.polygonreliefangle="90 Angle" thpad.airgapwidth=19.68 smdpad.connectstyle=Relief smdpad.reliefconductorwidth=9.84 smdpad.reliefentries=4 smdpad.polygonreliefangle="90 Angle" smdpad.airgapwidth=9.84 via.connectstyle=Direct via.reliefconductorwidth=5.12 via.reliefentries=2 via.polygonreliefangle="90 Angle" via.airgapwidth=0
PolygonConnect PolygonConnect_In_GND_L01_P042 [IsNamedPolygon('GND_L01_P042')] p65: thpad.connectstyle=Relief thpad.reliefconductorwidth=19.68 thpad.reliefentries=4 thpad.polygonreliefangle="90 Angle" thpad.airgapwidth=19.68 smdpad.connectstyle=Relief smdpad.reliefconductorwidth=9.84 smdpad.reliefentries=4 smdpad.polygonreliefangle="90 Angle" smdpad.airgapwidth=9.84 via.connectstyle=Direct via.reliefconductorwidth=5.12 via.reliefentries=2 via.polygonreliefangle="90 Angle" via.airgapwidth=0
PolygonConnect PolygonConnect_In_GND_L01_P028 [IsNamedPolygon('GND_L01_P028')] p66: thpad.connectstyle=Relief thpad.reliefconductorwidth=19.68 thpad.reliefentries=4 thpad.polygonreliefangle="90 Angle" thpad.airgapwidth=19.68 smdpad.connectstyle=Relief smdpad.reliefconductorwidth=9.84 smdpad.reliefentries=4 smdpad.polygonreliefangle="90 Angle" smdpad.airgapwidth=9.84 via.connectstyle=Direct via.reliefconductorwidth=5.12 via.reliefentries=2 via.polygonreliefangle="90 Angle" via.airgapwidth=0
PolygonConnect PolygonConnect_In_GND_L01_P029 [IsNamedPolygon('GND_L01_P029')] p67: thpad.connectstyle=Relief thpad.reliefconductorwidth=19.68 thpad.reliefentries=4 thpad.polygonreliefangle="90 Angle" thpad.airgapwidth=19.68 smdpad.connectstyle=Relief smdpad.reliefconductorwidth=9.84 smdpad.reliefentries=4 smdpad.polygonreliefangle="90 Angle" smdpad.airgapwidth=9.84 via.connectstyle=Direct via.reliefconductorwidth=5.12 via.reliefentries=2 via.polygonreliefangle="90 Angle" via.airgapwidth=0
PolygonConnect PolygonConnect_In_~OUT_L01_P002 [IsNamedPolygon('~OUT_L01_P002')] p68: thpad.connectstyle=Relief thpad.reliefconductorwidth=19.68 thpad.reliefentries=4 thpad.polygonreliefangle="90 Angle" thpad.airgapwidth=19.68 smdpad.connectstyle=Relief smdpad.reliefconductorwidth=9.84 smdpad.reliefentries=4 smdpad.polygonreliefangle="90 Angle" smdpad.airgapwidth=9.84 via.connectstyle=Direct via.reliefconductorwidth=5.12 via.reliefentries=2 via.polygonreliefangle="90 Angle" via.airgapwidth=0
PolygonConnect PolygonConnect_In_~OUT_L01_P003 [IsNamedPolygon('~OUT_L01_P003')] p69: thpad.connectstyle=Relief thpad.reliefconductorwidth=19.68 thpad.reliefentries=4 thpad.polygonreliefangle="90 Angle" thpad.airgapwidth=19.68 smdpad.connectstyle=Relief smdpad.reliefconductorwidth=9.84 smdpad.reliefentries=4 smdpad.polygonreliefangle="90 Angle" smdpad.airgapwidth=9.84 via.connectstyle=Direct via.reliefconductorwidth=5.12 via.reliefentries=2 via.polygonreliefangle="90 Angle" via.airgapwidth=0
PolygonConnect PolygonConnect_In_GND_L01_P026 [IsNamedPolygon('GND_L01_P026')] p70: thpad.connectstyle=Relief thpad.reliefconductorwidth=19.68 thpad.reliefentries=4 thpad.polygonreliefangle="90 Angle" thpad.airgapwidth=19.68 smdpad.connectstyle=Relief smdpad.reliefconductorwidth=9.84 smdpad.reliefentries=4 smdpad.polygonreliefangle="90 Angle" smdpad.airgapwidth=9.84 via.connectstyle=Direct via.reliefconductorwidth=5.12 via.reliefentries=2 via.polygonreliefangle="90 Angle" via.airgapwidth=0
PolygonConnect PolygonConnect_In_GND_L01_P061 [IsNamedPolygon('GND_L01_P061')] p71: thpad.connectstyle=Relief thpad.reliefconductorwidth=19.68 thpad.reliefentries=4 thpad.polygonreliefangle="90 Angle" thpad.airgapwidth=19.68 smdpad.connectstyle=Relief smdpad.reliefconductorwidth=9.84 smdpad.reliefentries=4 smdpad.polygonreliefangle="90 Angle" smdpad.airgapwidth=9.84 via.connectstyle=Direct via.reliefconductorwidth=5.12 via.reliefentries=2 via.polygonreliefangle="90 Angle" via.airgapwidth=0
PolygonConnect PolygonConnect_In_GND_L01_P041 [IsNamedPolygon('GND_L01_P041')] p72: thpad.connectstyle=Relief thpad.reliefconductorwidth=19.68 thpad.reliefentries=4 thpad.polygonreliefangle="90 Angle" thpad.airgapwidth=19.68 smdpad.connectstyle=Relief smdpad.reliefconductorwidth=9.84 smdpad.reliefentries=4 smdpad.polygonreliefangle="90 Angle" smdpad.airgapwidth=9.84 via.connectstyle=Direct via.reliefconductorwidth=5.12 via.reliefentries=2 via.polygonreliefangle="90 Angle" via.airgapwidth=0
PolygonConnect PolygonConnect_In_GND_L01_P073 [IsNamedPolygon('GND_L01_P073')] p73: thpad.connectstyle=Relief thpad.reliefconductorwidth=19.68 thpad.reliefentries=4 thpad.polygonreliefangle="90 Angle" thpad.airgapwidth=19.68 smdpad.connectstyle=Relief smdpad.reliefconductorwidth=9.84 smdpad.reliefentries=4 smdpad.polygonreliefangle="90 Angle" smdpad.airgapwidth=9.84 via.connectstyle=Direct via.reliefconductorwidth=5.12 via.reliefentries=2 via.polygonreliefangle="90 Angle" via.airgapwidth=0
PolygonConnect PolygonConnect_In_-U_COM_L02_P094 [IsNamedPolygon('-U_COM_L02_P094')] p74: thpad.connectstyle=Relief thpad.reliefconductorwidth=19.68 thpad.reliefentries=4 thpad.polygonreliefangle="90 Angle" thpad.airgapwidth=19.68 smdpad.connectstyle=Relief smdpad.reliefconductorwidth=9.84 smdpad.reliefentries=4 smdpad.polygonreliefangle="90 Angle" smdpad.airgapwidth=9.84 via.connectstyle=Direct via.reliefconductorwidth=5.12 via.reliefentries=2 via.polygonreliefangle="90 Angle" via.airgapwidth=0
PolygonConnect PolygonConnect_In_GND_L01_P027 [IsNamedPolygon('GND_L01_P027')] p75: thpad.connectstyle=Relief thpad.reliefconductorwidth=19.68 thpad.reliefentries=4 thpad.polygonreliefangle="90 Angle" thpad.airgapwidth=19.68 smdpad.connectstyle=Relief smdpad.reliefconductorwidth=9.84 smdpad.reliefentries=4 smdpad.polygonreliefangle="90 Angle" smdpad.airgapwidth=9.84 via.connectstyle=Direct via.reliefconductorwidth=5.12 via.reliefentries=2 via.polygonreliefangle="90 Angle" via.airgapwidth=0
PolygonConnect PolygonConnect_In_GND_L01_P062 [IsNamedPolygon('GND_L01_P062')] p76: thpad.connectstyle=Relief thpad.reliefconductorwidth=19.68 thpad.reliefentries=4 thpad.polygonreliefangle="90 Angle" thpad.airgapwidth=19.68 smdpad.connectstyle=Relief smdpad.reliefconductorwidth=9.84 smdpad.reliefentries=4 smdpad.polygonreliefangle="90 Angle" smdpad.airgapwidth=9.84 via.connectstyle=Direct via.reliefconductorwidth=5.12 via.reliefentries=2 via.polygonreliefangle="90 Angle" via.airgapwidth=0
PolygonConnect PolygonConnect_In_GND_L01_P046 [IsNamedPolygon('GND_L01_P046')] p77: thpad.connectstyle=Relief thpad.reliefconductorwidth=19.68 thpad.reliefentries=4 thpad.polygonreliefangle="90 Angle" thpad.airgapwidth=19.68 smdpad.connectstyle=Relief smdpad.reliefconductorwidth=9.84 smdpad.reliefentries=4 smdpad.polygonreliefangle="90 Angle" smdpad.airgapwidth=9.84 via.connectstyle=Direct via.reliefconductorwidth=5.12 via.reliefentries=2 via.polygonreliefangle="90 Angle" via.airgapwidth=0
PolygonConnect PolygonConnect_In_GND_L01_P077 [IsNamedPolygon('GND_L01_P077')] p78: thpad.connectstyle=Relief thpad.reliefconductorwidth=19.68 thpad.reliefentries=4 thpad.polygonreliefangle="90 Angle" thpad.airgapwidth=19.68 smdpad.connectstyle=Relief smdpad.reliefconductorwidth=9.84 smdpad.reliefentries=4 smdpad.polygonreliefangle="90 Angle" smdpad.airgapwidth=9.84 via.connectstyle=Direct via.reliefconductorwidth=5.12 via.reliefentries=2 via.polygonreliefangle="90 Angle" via.airgapwidth=0
PolygonConnect PolygonConnect_In_-U_COM_L02_P101 [IsNamedPolygon('-U_COM_L02_P101')] p79: thpad.connectstyle=Relief thpad.reliefconductorwidth=19.68 thpad.reliefentries=4 thpad.polygonreliefangle="90 Angle" thpad.airgapwidth=19.68 smdpad.connectstyle=Relief smdpad.reliefconductorwidth=9.84 smdpad.reliefentries=4 smdpad.polygonreliefangle="90 Angle" smdpad.airgapwidth=9.84 via.connectstyle=Direct via.reliefconductorwidth=5.12 via.reliefentries=2 via.polygonreliefangle="90 Angle" via.airgapwidth=0
PolygonConnect PolygonConnect_In_GND_L01_P039 [IsNamedPolygon('GND_L01_P039')] p80: thpad.connectstyle=Relief thpad.reliefconductorwidth=19.68 thpad.reliefentries=4 thpad.polygonreliefangle="90 Angle" thpad.airgapwidth=19.68 smdpad.connectstyle=Relief smdpad.reliefconductorwidth=9.84 smdpad.reliefentries=4 smdpad.polygonreliefangle="90 Angle" smdpad.airgapwidth=9.84 via.connectstyle=Direct via.reliefconductorwidth=5.12 via.reliefentries=2 via.polygonreliefangle="90 Angle" via.airgapwidth=0
PolygonConnect PolygonConnect_In_GND_L01_P078 [IsNamedPolygon('GND_L01_P078')] p81: thpad.connectstyle=Relief thpad.reliefconductorwidth=19.68 thpad.reliefentries=4 thpad.polygonreliefangle="90 Angle" thpad.airgapwidth=19.68 smdpad.connectstyle=Relief smdpad.reliefconductorwidth=9.84 smdpad.reliefentries=4 smdpad.polygonreliefangle="90 Angle" smdpad.airgapwidth=9.84 via.connectstyle=Direct via.reliefconductorwidth=5.12 via.reliefentries=2 via.polygonreliefangle="90 Angle" via.airgapwidth=0
PolygonConnect PolygonConnect_In_GND_L01_P072 [IsNamedPolygon('GND_L01_P072')] p82: thpad.connectstyle=Relief thpad.reliefconductorwidth=19.68 thpad.reliefentries=4 thpad.polygonreliefangle="90 Angle" thpad.airgapwidth=19.68 smdpad.connectstyle=Relief smdpad.reliefconductorwidth=9.84 smdpad.reliefentries=4 smdpad.polygonreliefangle="90 Angle" smdpad.airgapwidth=9.84 via.connectstyle=Direct via.reliefconductorwidth=5.12 via.reliefentries=2 via.polygonreliefangle="90 Angle" via.airgapwidth=0
PolygonConnect PolygonConnect_In_OUT_L02_P008 [IsNamedPolygon('OUT_L02_P008')] p83: thpad.connectstyle=Relief thpad.reliefconductorwidth=19.68 thpad.reliefentries=4 thpad.polygonreliefangle="90 Angle" thpad.airgapwidth=19.68 smdpad.connectstyle=Relief smdpad.reliefconductorwidth=9.84 smdpad.reliefentries=4 smdpad.polygonreliefangle="90 Angle" smdpad.airgapwidth=9.84 via.connectstyle=Direct via.reliefconductorwidth=5.12 via.reliefentries=2 via.polygonreliefangle="90 Angle" via.airgapwidth=0
PolygonConnect PolygonConnect_In_GND_L01_P036 [IsNamedPolygon('GND_L01_P036')] p84: thpad.connectstyle=Relief thpad.reliefconductorwidth=19.68 thpad.reliefentries=4 thpad.polygonreliefangle="90 Angle" thpad.airgapwidth=19.68 smdpad.connectstyle=Relief smdpad.reliefconductorwidth=9.84 smdpad.reliefentries=4 smdpad.polygonreliefangle="90 Angle" smdpad.airgapwidth=9.84 via.connectstyle=Direct via.reliefconductorwidth=5.12 via.reliefentries=2 via.polygonreliefangle="90 Angle" via.airgapwidth=0
PolygonConnect PolygonConnect_In_GND_L01_P054 [IsNamedPolygon('GND_L01_P054')] p85: thpad.connectstyle=Relief thpad.reliefconductorwidth=19.68 thpad.reliefentries=4 thpad.polygonreliefangle="90 Angle" thpad.airgapwidth=19.68 smdpad.connectstyle=Relief smdpad.reliefconductorwidth=9.84 smdpad.reliefentries=4 smdpad.polygonreliefangle="90 Angle" smdpad.airgapwidth=9.84 via.connectstyle=Direct via.reliefconductorwidth=5.12 via.reliefentries=2 via.polygonreliefangle="90 Angle" via.airgapwidth=0
PolygonConnect PolygonConnect_In_~IN_COM_L01_P019 [IsNamedPolygon('~IN_COM_L01_P019')] p86: thpad.connectstyle=Relief thpad.reliefconductorwidth=19.68 thpad.reliefentries=4 thpad.polygonreliefangle="90 Angle" thpad.airgapwidth=19.68 smdpad.connectstyle=Relief smdpad.reliefconductorwidth=9.84 smdpad.reliefentries=4 smdpad.polygonreliefangle="90 Angle" smdpad.airgapwidth=9.84 via.connectstyle=Direct via.reliefconductorwidth=5.12 via.reliefentries=2 via.polygonreliefangle="90 Angle" via.airgapwidth=0
PolygonConnect PolygonConnect_In_GND_L02_P031 [IsNamedPolygon('GND_L02_P031')] p87: thpad.connectstyle=Relief thpad.reliefconductorwidth=19.68 thpad.reliefentries=4 thpad.polygonreliefangle="90 Angle" thpad.airgapwidth=19.68 smdpad.connectstyle=Relief smdpad.reliefconductorwidth=9.84 smdpad.reliefentries=4 smdpad.polygonreliefangle="90 Angle" smdpad.airgapwidth=9.84 via.connectstyle=Direct via.reliefconductorwidth=5.12 via.reliefentries=2 via.polygonreliefangle="90 Angle" via.airgapwidth=0
PolygonConnect PolygonConnect_In_IN_COM_L02_P013 [IsNamedPolygon('IN_COM_L02_P013')] p88: thpad.connectstyle=Relief thpad.reliefconductorwidth=19.68 thpad.reliefentries=4 thpad.polygonreliefangle="90 Angle" thpad.airgapwidth=19.68 smdpad.connectstyle=Relief smdpad.reliefconductorwidth=9.84 smdpad.reliefentries=4 smdpad.polygonreliefangle="90 Angle" smdpad.airgapwidth=9.84 via.connectstyle=Direct via.reliefconductorwidth=5.12 via.reliefentries=2 via.polygonreliefangle="90 Angle" via.airgapwidth=0
PolygonConnect PolygonConnect_In_-U_COM_L02_P098 [IsNamedPolygon('-U_COM_L02_P098')] p89: thpad.connectstyle=Relief thpad.reliefconductorwidth=19.68 thpad.reliefentries=4 thpad.polygonreliefangle="90 Angle" thpad.airgapwidth=19.68 smdpad.connectstyle=Relief smdpad.reliefconductorwidth=9.84 smdpad.reliefentries=4 smdpad.polygonreliefangle="90 Angle" smdpad.airgapwidth=9.84 via.connectstyle=Direct via.reliefconductorwidth=5.12 via.reliefentries=2 via.polygonreliefangle="90 Angle" via.airgapwidth=0
PolygonConnect PolygonConnect_In_OUT_L01_P007 [IsNamedPolygon('OUT_L01_P007')] p90: thpad.connectstyle=Relief thpad.reliefconductorwidth=19.68 thpad.reliefentries=4 thpad.polygonreliefangle="90 Angle" thpad.airgapwidth=19.68 smdpad.connectstyle=Relief smdpad.reliefconductorwidth=9.84 smdpad.reliefentries=4 smdpad.polygonreliefangle="90 Angle" smdpad.airgapwidth=9.84 via.connectstyle=Direct via.reliefconductorwidth=5.12 via.reliefentries=2 via.polygonreliefangle="90 Angle" via.airgapwidth=0
PolygonConnect PolygonConnect_In_GND_L01_P025 [IsNamedPolygon('GND_L01_P025')] p91: thpad.connectstyle=Relief thpad.reliefconductorwidth=19.68 thpad.reliefentries=4 thpad.polygonreliefangle="90 Angle" thpad.airgapwidth=19.68 smdpad.connectstyle=Relief smdpad.reliefconductorwidth=9.84 smdpad.reliefentries=4 smdpad.polygonreliefangle="90 Angle" smdpad.airgapwidth=9.84 via.connectstyle=Direct via.reliefconductorwidth=5.12 via.reliefentries=2 via.polygonreliefangle="90 Angle" via.airgapwidth=0
PolygonConnect PolygonConnect_In_-U_COM_L02_P102 [IsNamedPolygon('-U_COM_L02_P102')] p92: thpad.connectstyle=Relief thpad.reliefconductorwidth=19.68 thpad.reliefentries=4 thpad.polygonreliefangle="90 Angle" thpad.airgapwidth=19.68 smdpad.connectstyle=Relief smdpad.reliefconductorwidth=9.84 smdpad.reliefentries=4 smdpad.polygonreliefangle="90 Angle" smdpad.airgapwidth=9.84 via.connectstyle=Direct via.reliefconductorwidth=5.12 via.reliefentries=2 via.polygonreliefangle="90 Angle" via.airgapwidth=0
PolygonConnect PolygonConnect_In_-U_COM_L02_P093 [IsNamedPolygon('-U_COM_L02_P093')] p93: thpad.connectstyle=Relief thpad.reliefconductorwidth=19.68 thpad.reliefentries=4 thpad.polygonreliefangle="90 Angle" thpad.airgapwidth=19.68 smdpad.connectstyle=Relief smdpad.reliefconductorwidth=9.84 smdpad.reliefentries=4 smdpad.polygonreliefangle="90 Angle" smdpad.airgapwidth=9.84 via.connectstyle=Direct via.reliefconductorwidth=5.12 via.reliefentries=2 via.polygonreliefangle="90 Angle" via.airgapwidth=0
PolygonConnect PolygonConnect_In_GND_L02_P044 [IsNamedPolygon('GND_L02_P044')] p94: thpad.connectstyle=Relief thpad.reliefconductorwidth=19.68 thpad.reliefentries=4 thpad.polygonreliefangle="90 Angle" thpad.airgapwidth=19.68 smdpad.connectstyle=Relief smdpad.reliefconductorwidth=9.84 smdpad.reliefentries=4 smdpad.polygonreliefangle="90 Angle" smdpad.airgapwidth=9.84 via.connectstyle=Direct via.reliefconductorwidth=5.12 via.reliefentries=2 via.polygonreliefangle="90 Angle" via.airgapwidth=0
PolygonConnect PolygonConnect_In_+U_COM_L02_P105 [IsNamedPolygon('+U_COM_L02_P105')] p95: thpad.connectstyle=Relief thpad.reliefconductorwidth=19.68 thpad.reliefentries=4 thpad.polygonreliefangle="90 Angle" thpad.airgapwidth=19.68 smdpad.connectstyle=Relief smdpad.reliefconductorwidth=9.84 smdpad.reliefentries=4 smdpad.polygonreliefangle="90 Angle" smdpad.airgapwidth=9.84 via.connectstyle=Direct via.reliefconductorwidth=5.12 via.reliefentries=2 via.polygonreliefangle="90 Angle" via.airgapwidth=0
PolygonConnect PolygonConnect_In_GND_L01_P071 [IsNamedPolygon('GND_L01_P071')] p96: thpad.connectstyle=Relief thpad.reliefconductorwidth=19.68 thpad.reliefentries=4 thpad.polygonreliefangle="90 Angle" thpad.airgapwidth=19.68 smdpad.connectstyle=Relief smdpad.reliefconductorwidth=9.84 smdpad.reliefentries=4 smdpad.polygonreliefangle="90 Angle" smdpad.airgapwidth=9.84 via.connectstyle=Direct via.reliefconductorwidth=5.12 via.reliefentries=2 via.polygonreliefangle="90 Angle" via.airgapwidth=0
PolygonConnect PolygonConnect_In_-U_COM_L02_P096 [IsNamedPolygon('-U_COM_L02_P096')] p97: thpad.connectstyle=Relief thpad.reliefconductorwidth=19.68 thpad.reliefentries=4 thpad.polygonreliefangle="90 Angle" thpad.airgapwidth=19.68 smdpad.connectstyle=Relief smdpad.reliefconductorwidth=9.84 smdpad.reliefentries=4 smdpad.polygonreliefangle="90 Angle" smdpad.airgapwidth=9.84 via.connectstyle=Direct via.reliefconductorwidth=5.12 via.reliefentries=2 via.polygonreliefangle="90 Angle" via.airgapwidth=0